# Altium PCB PneuBoardV2.PcbDoc
Units mil, origin at the board's own origin, x right, y up, seen from the top; angles counter-clockwise.
Board outline 6000 x 4000 mil, 2 copper layers (Top Layer, Bottom Layer); 31 components, 26 nets, 74 pads, 6 vias.
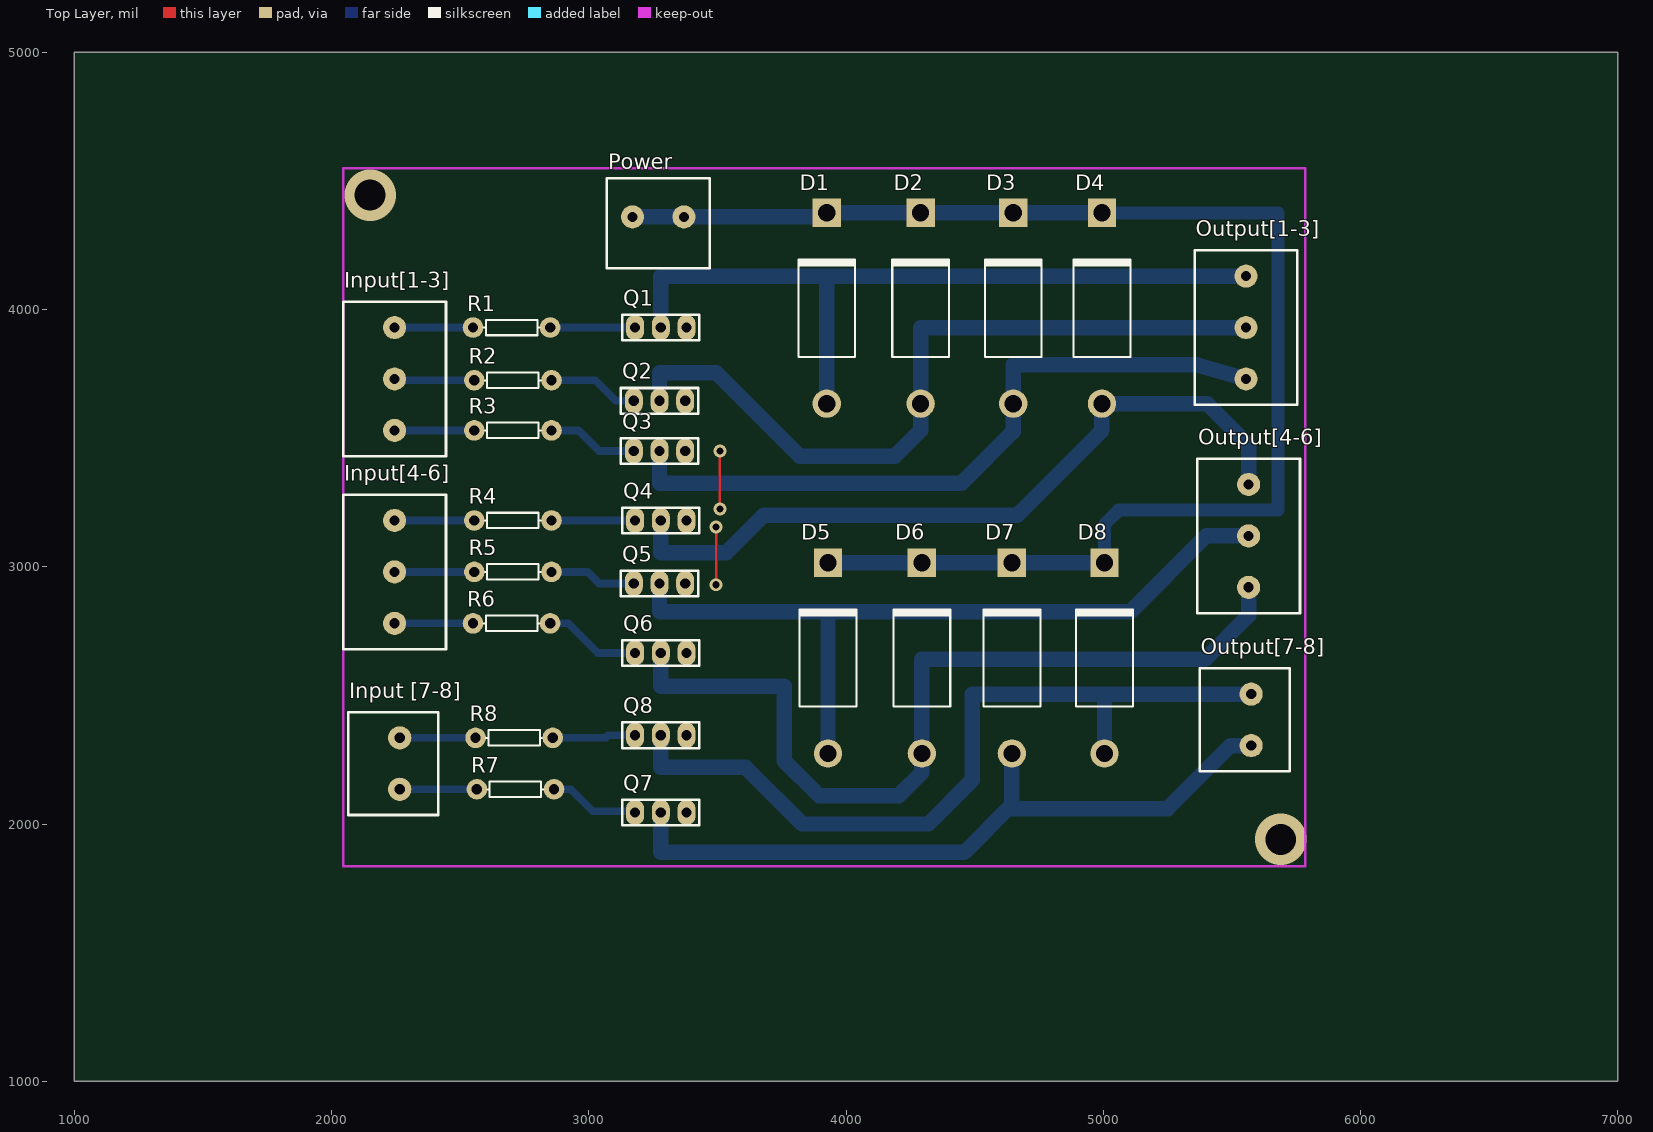
[diagram p0: Top Layer view]
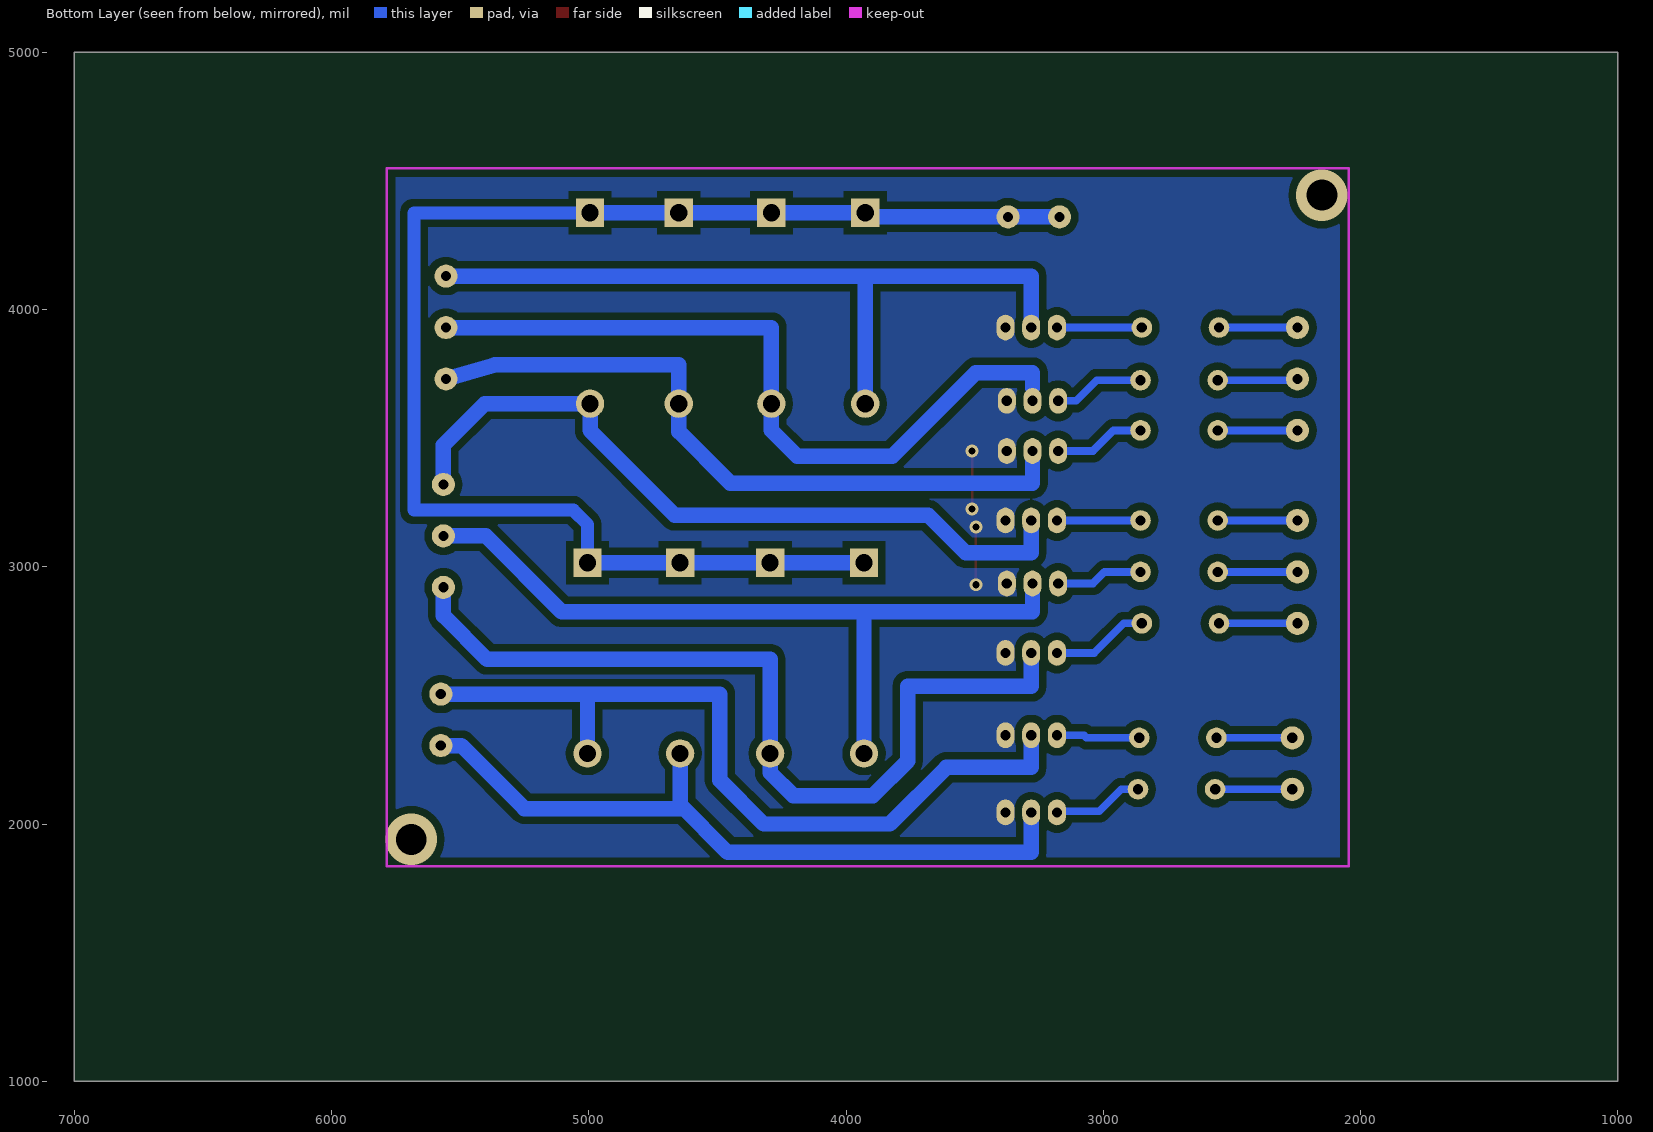
[diagram p1: Bottom Layer view, seen from below]

## Layer stack, top to bottom
Top Layer: signal copper 1.4
Dielectric: dielectric 12.6, FR-4, Dk 4.8
Bottom Layer: signal copper 1.4

## Board outline
1000,1000 7000,1000 7000,5000 1000,5000

## Design rules (kind name [scope] priority, off if disabled: settings)
Clearance [All] p1: gap=20
PolygonConnect [All] p1: connectstyle=Direct reliefconductorwidth=10 reliefentries=4 polygonreliefangle="90 Angle" airgapwidth=10
RoutingVias [All] p1: holewidth=28 width=50 viastyle="Through Hole" minholewidth=28 minwidth=50 maxholewidth=28 maxwidth=50
SolderMaskExpansion [All] p1: expansion=4
Width [All] p1: maxlimit=100 minlimit=10 preferedwidth=40 toplayer_maxwidth=10 toplayer_prefwidth=10 bottomlayer_minwidth=30 minimp=50.000000 maximp=50.000000 favimp=50.000000
28 further rules are at their usual default settings.

## Components (designator, comment, footprint, x,y, rotation, side; value= is the part's Value field where it differs from the comment)
D1 "Diode 1N5408" DO-201AD 3925,4005 r90 top
D2 "Diode 1N5408" DO-201AD 4290,4005 r90 top
D3 "Diode 1N5408" DO-201AD 4650,4005 r90 top
D4 "Diode 1N5408" DO-201AD 4995,4005 r90 top
D5 "Diode 1N5408" DO-201AD 3930,2645 r90 top
D6 "Diode 1N5408" DO-201AD 4295,2645 r90 top
D7 "Diode 1N5408" DO-201AD 4645,2645 r90 top
D8 "Diode 1N5408" DO-201AD 5005,2645 r90 top
"Input [7-8]" "Klema" Klema 2265,2235 r90 top
Input[1-3] "klema" klema3 2245,3730 r0 top
Input[4-6] "klema" klema3 2245,2980 r0 top
Output[1-3] "klema" klema3 5555,3930 r0 top
Output[4-6] "klema" klema3 5565,3120 r0 top
Output[7-8] "Klema" Klema 5575,2405 r90 top
Power "Klema" Klema 3270,4360 r180 top
Q1 "BD139" BD139 3280,3930 r180 top
Q2 "BD139" BD139 3275,3645 r180 top
Q3 "BD139" BD139 3275,3450 r180 top
Q4 "BD139" BD139 3280,3180 r180 top
Q5 "BD139" BD139 3275,2935 r180 top
Q6 "BD139" BD139 3280,2665 r180 top
Q7 "BD139" BD139 3280,2045 r180 top
Q8 "BD139" BD139 3280,2345 r180 top
R1 "Res1" AXIAL-0.3 2700,3930 r0 top
R2 "Res1" AXIAL-0.3 2705,3725 r0 top
R3 "Res1" AXIAL-0.3 2705,3530 r0 top
R4 "Res1" AXIAL-0.3 2705,3180 r0 top
R5 "Res1" AXIAL-0.3 2705,2980 r180 top
R6 "Res1" AXIAL-0.3 2700,2780 r180 top
R7 "Res1" AXIAL-0.3 2715,2135 r180 top
R8 "Res1" AXIAL-0.3 2710,2335 r180 top

## Footprints (in the part's own frame and the unit in brackets; to place one, negate y for a bottom-side part, rotate by r counter-clockwise, add the part's x,y. Pads: shape width x height; smd on the part's side, far side on the other; paste and mask are expansions set on the pad)
AXIAL-0.3 [mil] "Axial Device, Thru-Hole; 2 Leads; 0.3 in Pin Spacing"
  round 80 hole 40: 1(-150,0) 2(150,0)
  silkscreen extent -109,-30 109,30
BD139 [mil]
  oval 70x100 hole 40: 1(-100,0) 2(0,0) 3(100,0)
  silkscreen extent -150,-50 150,50
DO-201AD [mm] "Diode, Axial; Body 9.5 x 5.6 mm (LxDia. max), Lead Dia. 1.32 mm (max)"
  round 2.8 hole 1.7: 1(-9.42,0)
  rect 2.8x2.8 hole 1.7: 2(9.42,0)
  silkscreen extent -4.8,-2.8 4.9,2.8
Klema [mil]
  round 90 hole 40: 1(-100,0) 2(100,0)
  silkscreen extent -200,-150 200,200
klema3 [mil]
  round 90 hole 40: 1(0,200) 2(0,0) 3(0,-200)
  silkscreen extent -200,-300 200,300

## Part data
D1 D2 D3 D4 D5 D6 D7 D8: "3 Amp Medium Power Silicon Rectifier Diode"
Input[1-3] Input[4-6] Output[1-3] Output[4-6]: library part klema3
R1 R2 R3 R4 R5 R6 R7 R8: "Resistor"

## Via types
v1: diameter 50, hole 28, Top Layer to Bottom Layer, 4 vias
v2: diameter 200, hole 120, Top Layer to Bottom Layer, 2 vias

## Nets (pads, with @x,y where several pads share a name; then routed paths per layer and width w, separated by ;. In a path a pad name is that pad's centre, name@x,y a point inside that pad or via, vN(x,y) a via of type N, cw(c..) or ccw(c..) an arc to the next point about the centre after c; other vN are vias at no path point)
12V: D1.2 D2.2 D3.2 D4.2 D5.2 D6.2 D7.2 D8.2 Power.1 Power.2 | length 5603.6
  Bottom Layer w50: D4.2 5680,4375.87 5680,3220 5060,3220 5005,3165 D8.2
  Bottom Layer w60: Power.2 Power.1 3925,4360 D1.2 D2.2 D3.2 D4.2 ; D5.2 D6.2 D7.2 D8.2
GND: Q1.1 Q2.1 Q3.1 Q4.1 Q5.1 Q6.1 Q7.1 Q8.1 | length 450
  Top Layer w10: v1(3495,2930) v1(3495,3155) ; v1(3510,3225) v1(3510,3450)
IN1: Input[1-3].1 R1.1 | length 305
  Bottom Layer w30: Input[1-3].1 R1.1
IN2: Input[1-3].2 R2.1 | length 315
  Bottom Layer w30: Input[1-3].2 2245,3725 R2.1
IN3: Input[1-3].3 R3.1 | length 310
  Bottom Layer w30: Input[1-3].3 R3.1
IN4: Input[4-6].1 R4.1 | length 310
  Bottom Layer w30: Input[4-6].1 R4.1
IN5: Input[4-6].2 R5.2 | length 310
  Bottom Layer w30: Input[4-6].2 R5.2
IN6: Input[4-6].3 R6.2 | length 305
  Bottom Layer w30: Input[4-6].3 R6.2
IN7: "Input [7-8].1" R7.2 | length 300
  Bottom Layer w30: 2265,2135 R7.2
IN8: "Input [7-8].2" R8.2 | length 295
  Bottom Layer w30: 2265,2335 R8.2
NetQ1_3: Q1.3 R1.2 | length 330
  Bottom Layer w30: R1.2 Q1.3
NetQ2_3: Q2.3 R2.2 | length 353.1
  Bottom Layer w30: R2.2 3025,3725 3105,3645 Q2.3
NetQ3_3: Q3.3 R3.2 | length 353.1
  Bottom Layer w30: R3.2 2960,3530 3040,3450 Q3.3
NetQ4_3: Q4.3 R4.2 | length 325
  Bottom Layer w30: R4.2 Q4.3
NetQ5_3: Q5.3 R5.1 | length 338.6
  Bottom Layer w30: R5.1 2995,2980 3040,2935 Q5.3
NetQ6_3: Q6.3 R6.1 | length 377.6
  Bottom Layer w30: R6.1 2920,2780 3035,2665 Q6.3
NetQ7_3: Q7.3 R7.1 | length 352.3
  Bottom Layer w30: R7.1 2930,2135 3015,2050 3175,2050 Q7.3
NetQ8_3: Q8.3 R8.1 | length 324.1
  Bottom Layer w30: R8.1 3065,2335 3075,2345 Q8.3
OUT1: D1.1 Output[1-3].1 Q1.2 | length 2970.9
  Bottom Layer w60: Q1.2 3280,4130 3925,4130 ; D1.1 3925,4130 ; Output[1-3].1 3925,4130
OUT2: D2.1 Output[1-3].2 Q2.2 | length 2916
  Bottom Layer w60: 3275,3695 3275,3755 3495,3755 3820,3430 4190,3430 4290,3530 D2.1 4290,3930 Output[1-3].2
OUT3: D3.1 Output[1-3].3 Q3.2 | length 2755.6
  Bottom Layer w60: Q3.2 3275,3325 4450,3325 4650,3525 D3.1 4650,3785 5365,3785 Output[1-3].3
OUT4: D4.1 Output[4-6].1 Q4.2 | length 2930.8
  Bottom Layer w60: Q4.2 3280,3055 3535,3055 3680,3200 4665,3200 4995,3530 D4.1 5404.13,3634.13 5565,3473.27 Output[4-6].1
OUT5: D5.1 Output[4-6].2 Q5.2 | length 3073.1
  Bottom Layer w60: Q5.2 3275,2825 3930,2825 ; D5.1 3930,2825 ; Output[4-6].2 5400,3120 5105,2825 3930,2825
OUT6: D6.1 Output[4-6].3 Q6.2 | length 3418.6
  Bottom Layer w60: Q6.2 3280,2535 3760,2535 3760,2245 3895,2110 4205,2110 4295,2200 D6.1 4295,2640 5395,2640 5565,2810 Output[4-6].3
OUT7: D7.1 Output[7-8].1 Q7.2 | length 2842.2
  Bottom Layer w60: Q7.2 3280,1890 4460,1890 4645,2075 ; D7.1 4645,2060 5250,2060 5495,2305 Output[7-8].1
OUT8: D8.1 Output[7-8].2 Q8.2 | length 3137.4
  Bottom Layer w60: Q8.2 3280,2220 3610,2220 3830,2000 4320,2000 4490,2170 4490,2505 Output[7-8].2 ; D8.1 5005,2495
copper on no net:
  other v2: 5690,1940 2150,4445

## Polygon pours and split planes (outlines as drawn)
GND on Bottom Layer "Top Layer-No Net" (solid, remove dead copper, pour order 3): 1000,1000 7000,1000 7000,5000 1000,5000

## Keep-outs
Keep-Out Layer:
  lines w10: 2045,4545 2045,1835 5785,1835 5785,4550 2045,4550